# Altium PCB LED_Control.PcbDoc (part 1 of 2)
Units mil, origin at the board's own origin, x right, y up, seen from the top; angles counter-clockwise.
Board outline 2900 x 5000 mil, 4 copper layers (Top Layer, GND1, GND2, Bottom Layer), stack 51.864 mil thick; 104 components, 87 nets, 410 pads, 194 vias.
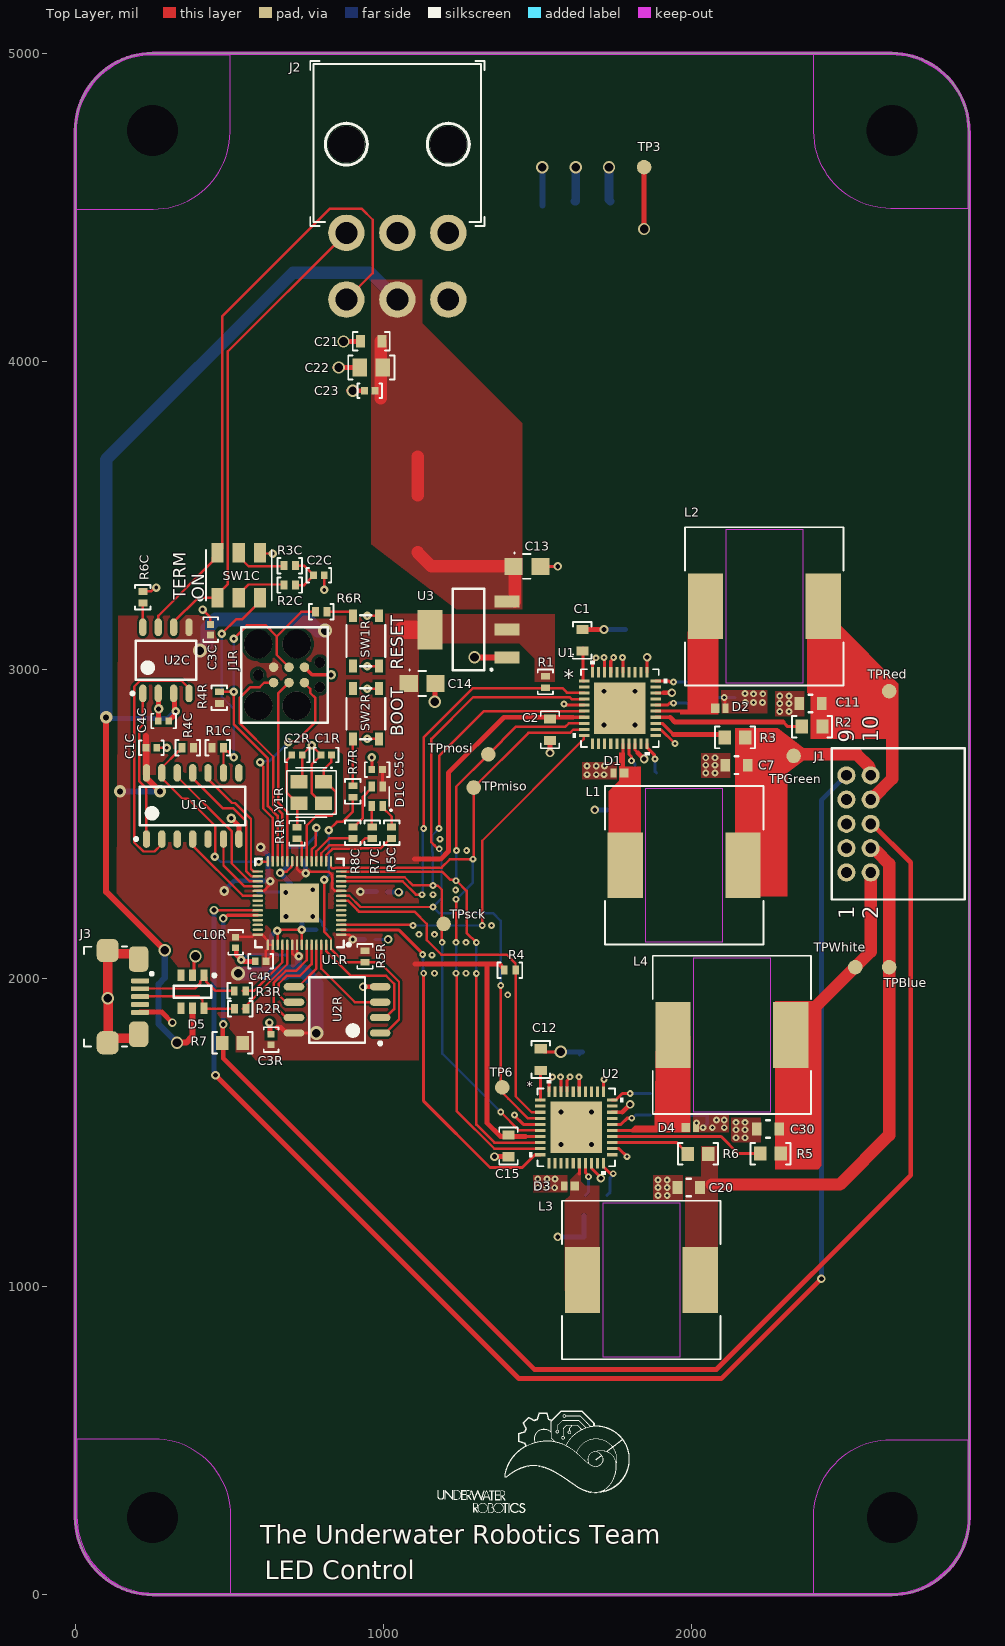
[diagram p0: Top Layer view]
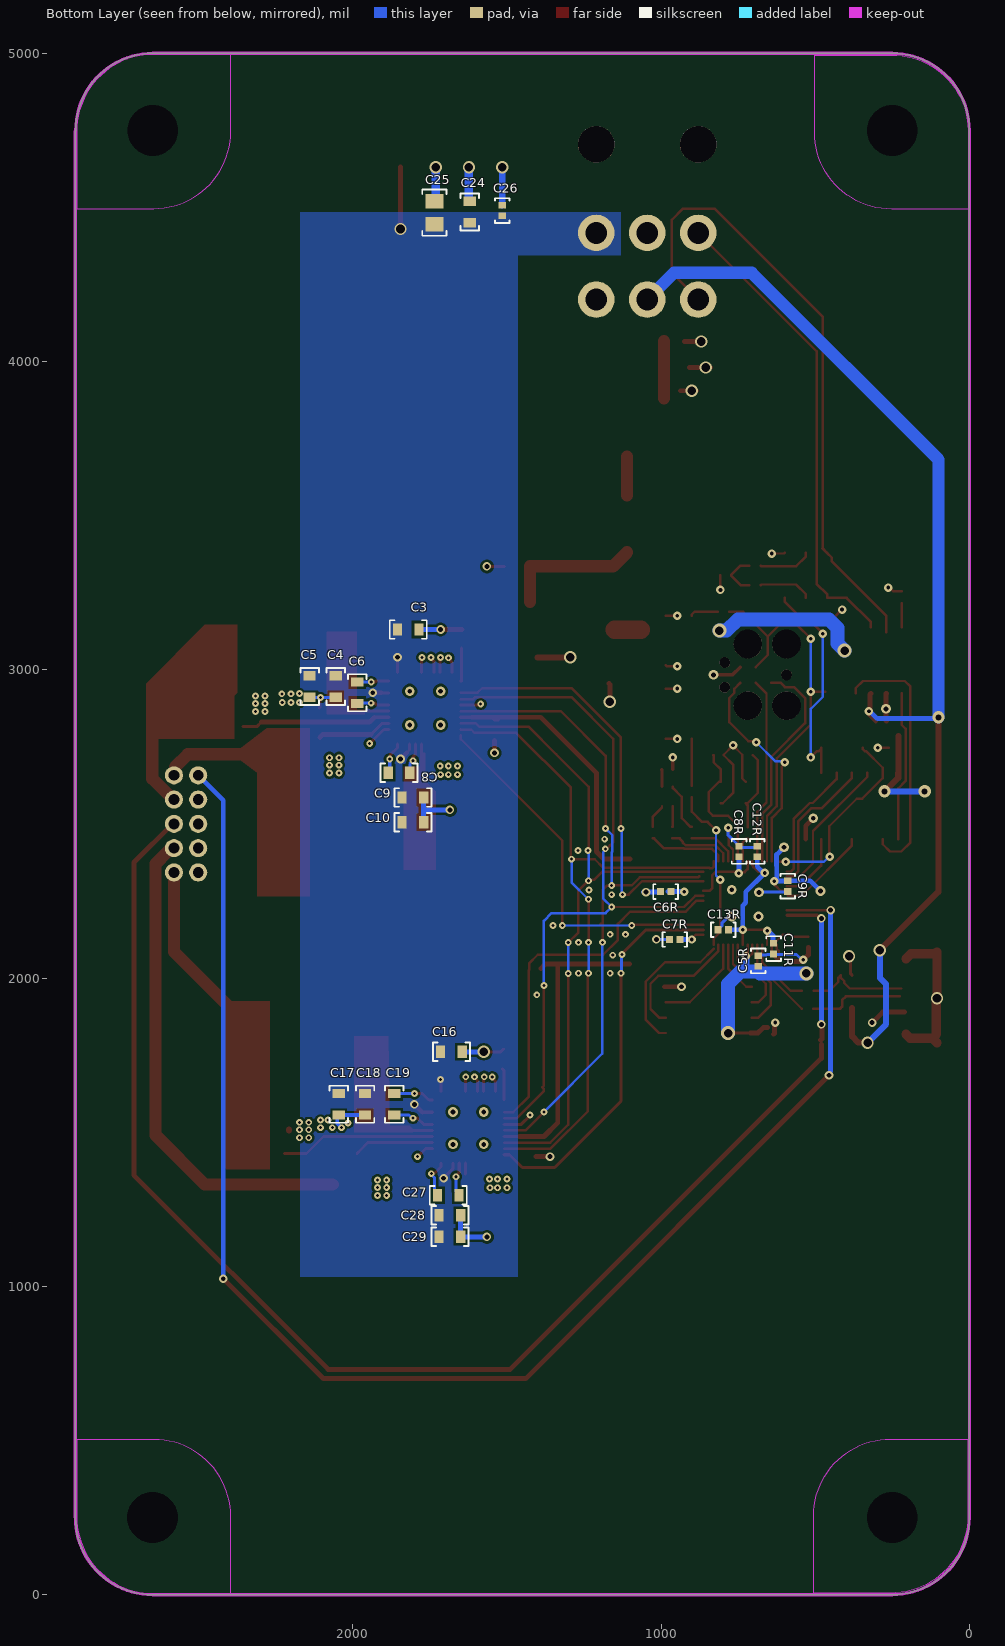
[diagram p1: Bottom Layer view, seen from below]
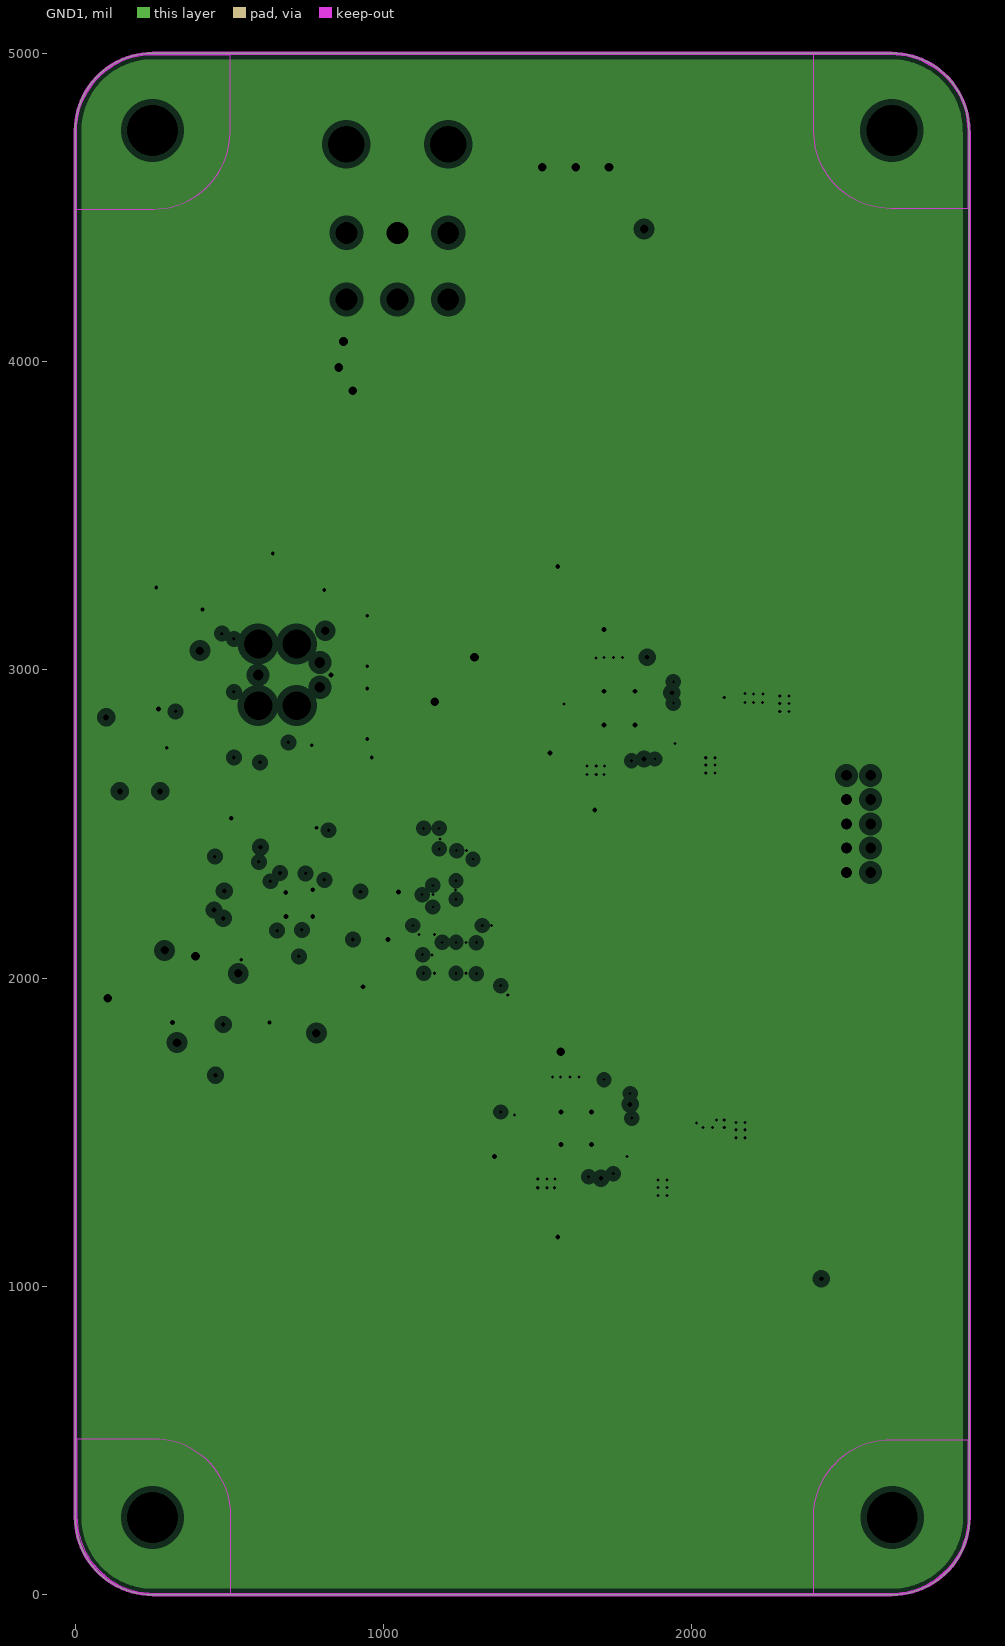
[diagram p2: GND1, clearances drawn from the general rule]
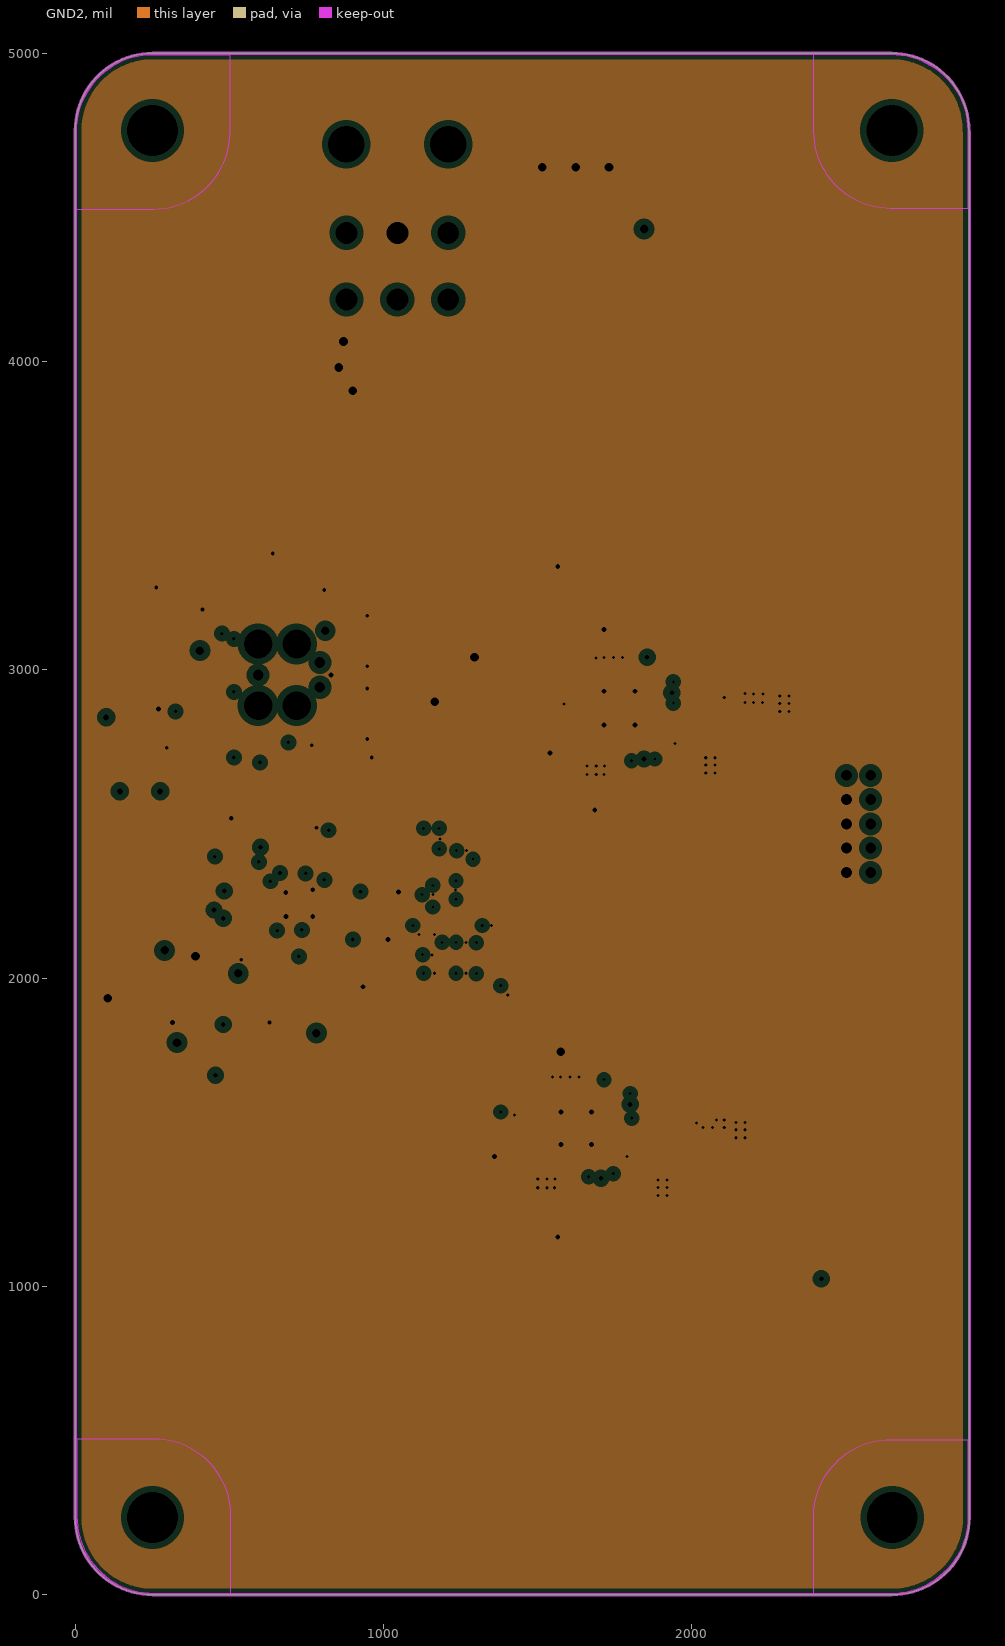
[diagram p3: GND2, clearances drawn from the general rule]
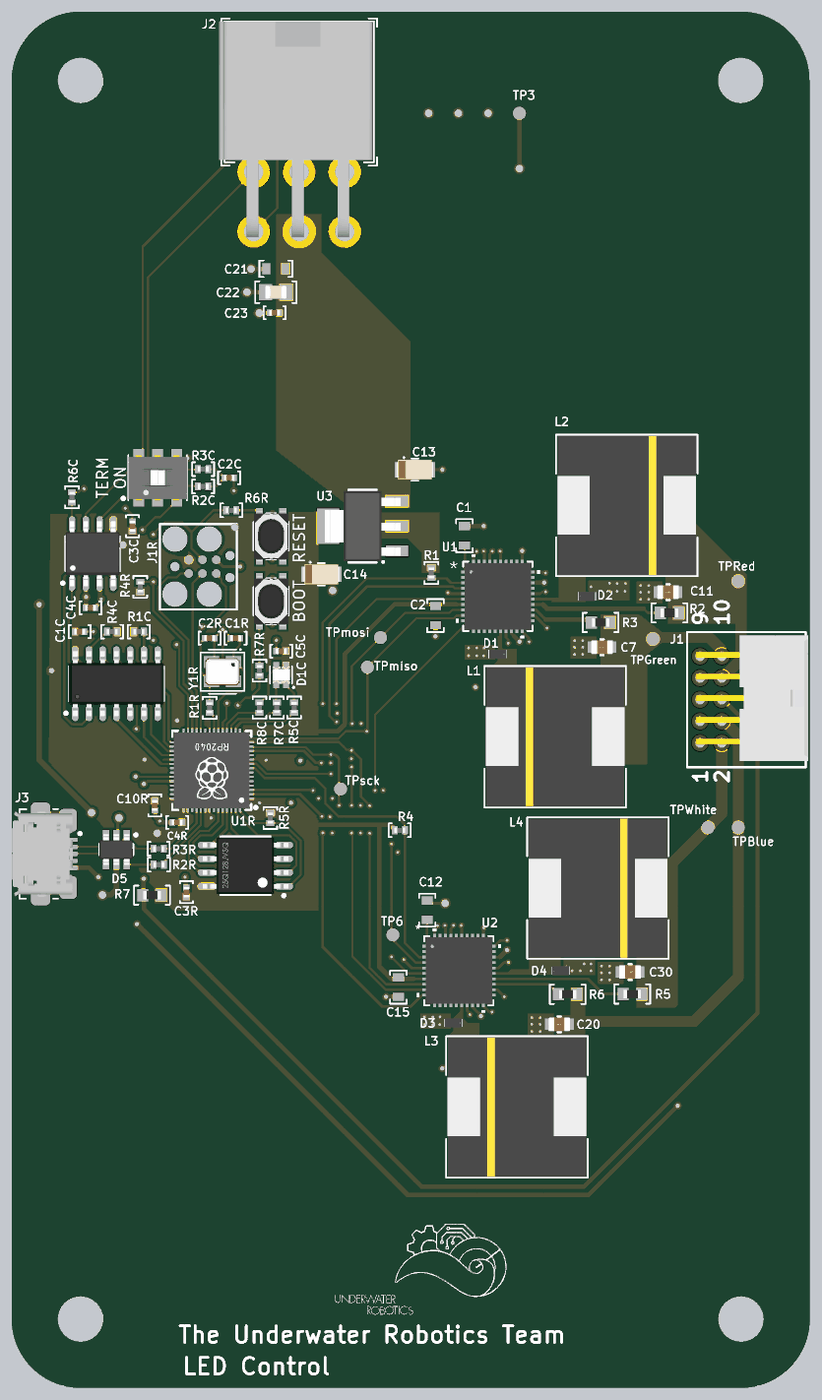
[diagram p5: 3D render of the assembled board from above, using the file's embedded part models]
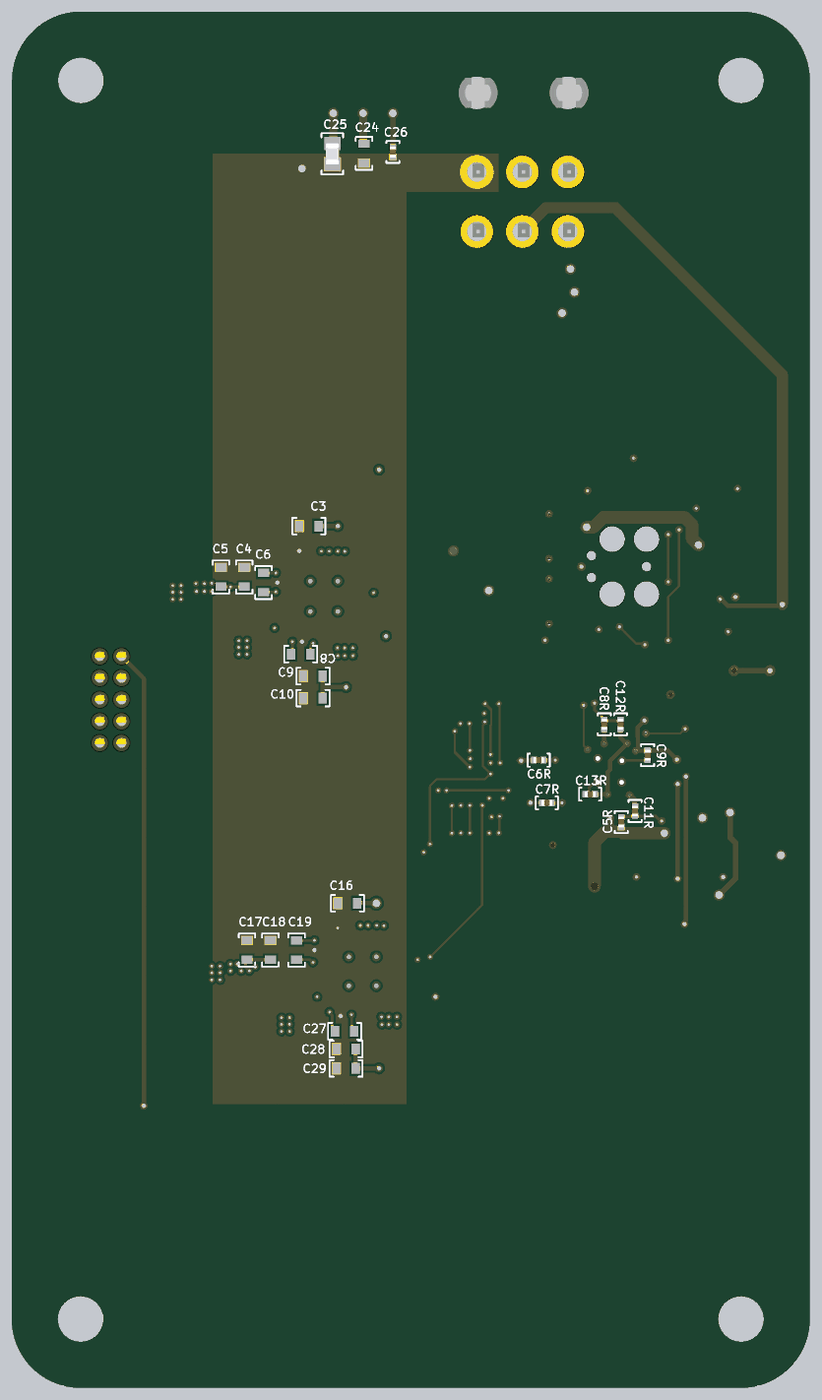
[diagram p6: 3D render of the assembled board from below, using the file's embedded part models]

## Layer stack, top to bottom
Top Solder: solder mask 1, SM-001, Dk 4
Top Layer: signal copper 1.378
Dielectric 1: prepreg 5.1, PP-017, Dk 4.3
Dielectric 2: prepreg 5.1, PP-017, Dk 4.3
GND1: plane copper 0.3539, net GND
Dielectric 3: core 28, Core-039, Dk 4.8
GND2: plane copper 0.3539, net GND
Dielectric 4: prepreg 5.1, PP-017, Dk 4.3
Dielectric 5: prepreg 5.1, PP-017, Dk 4.3
Bottom Layer: signal copper 1.378
Bottom Solder: solder mask 1, SM-001, Dk 4

## Board outline
0,250 0,4750 cw(c250,4750) 250,5000 2648.66,5000 cw(c2648.66,4750) 2898.66,4750 2900,4748.03 2900,250 2899.88,250 cw(c2649.88,250) 2649.88,0 250,0 cw(c250,250)

## Design rules (kind name [scope] priority, off if disabled: settings)
AcuteAngle [All] p1: minimum=6.00000000000000E+0001 checktracksonly=FALSE
BoardOutlineClearance "BoardOutlineClearance JLCPCB" [All] p1: gap=7.87 ignorepadtopadclearanceinfootprint=FALSE
Clearance "Clearance JLCPCB 4 layer" [All] p1: gap=7.87 ignorepadtopadclearanceinfootprint=FALSE except(3.54: Arc-Arc Arc-Track Track-Track; 5: Arc-SMDPad Track-SMDPad SMDPad-SMDPad; 10: Arc-Hole Track-Hole SMDPad-Hole THPad-Hole Via-Hole Fill-Hole Poly-Hole Region-Hole Text-Hole)
DiffPairsRouting [All] p1: maxlimit=10 minlimit=6 mostfreqgap=8 toplayer_minwidth=3.54 toplayer_maxwidth=15 toplayer_prefwidth=8 bottomlayer_minwidth=3.54 bottomlayer_maxwidth=15 bottomlayer_prefwidth=8 maxuncoupledlength=500
HoleSize "HoleSize JLCPCB Pad" [IsPad] p1: absolutevalues=TRUE maxlimit=248.03 minlimit=19.68 maxpercent=80.000 minpercent=20.000
HoleSize "HoleSize JLCPCB 4 layer" [All] p2: absolutevalues=TRUE maxlimit=248.03 minlimit=7.87 maxpercent=80.000 minpercent=20.000
HoleToHoleClearance "HoleToHoleClearance JLCPCB" [All] p1: gap=10 allowstackedmicrovias=TRUE
MinimumAnnularRing "MinimumAnnularRing JLCPCB Pad" [IsPad] p1: minimumring=11.81
MinimumAnnularRing "MinimumAnnularRing JLCPCB 1oz" [All] p2: minimumring=5.12
MinimumSolderMaskSliver [All] p1: minsoldermaskwidth=1
PlaneClearance [All] p1: clearance=20
PlaneConnect [All] p1: pad.planeconnectstyle=Relief pad.reliefexpansion=20 pad.reliefentries=4 pad.reliefconductorwidth=10 pad.reliefairgap=10 via.planeconnectstyle=Direct via.reliefexpansion=20 via.reliefentries=4 via.reliefconductorwidth=10 via.reliefairgap=10
PolygonConnect [All] p1: connectstyle=Direct reliefconductorwidth=15 reliefentries=4 polygonreliefangle="45 Angle" airgapwidth=10
RoutingVias "RoutingVias JLCPCB 4 layer" [All] p1: holewidth=19.68 width=39.37 viastyle="Through Hole" minholewidth=7.87 minwidth=15.75 maxholewidth=50 maxwidth=80
SilkToSilkClearance [All] p1: silktosilkclearance=3
SilkToSolderMaskClearance "SilkToSolderMaskClearance JLCPCB" [IsPad] p1: minsilkscreentomaskgap=5.91 clearancetoexposedcopper=TRUE
SolderMaskExpansion "SolderMaskExpansion JLCPCB" [All] p1: expansion=1.97 istentingtop=FALSE
Width "Width JLCPCB 4 layer" [All] p1: maxlimit=196.85 minlimit=3.54 preferedwidth=9.84 minimp=50.000000 maximp=50.000000 favimp=50.000000
22 further rules are at their usual default settings.

## Classes and differential pairs
differential pair class "USB 2.0": USB USB_RP2040
component class U_RP2040_with_CAN: C1C C2C C3C C4C C5C D1C R1C R2C R3C R4C R5C R6C R7C R8C SW1C U1C U2C
component class U_RP2040_C: C1R C2R C3R C4R C5R C6R C7R C8R C9R C10R C11R C12R C13R J1R R1R R2R R3R R4R R5R R6R R7R SW1R SW2R U1R U2R Y1R
component class LED_Board_control: C1 C2 C3 C4 C5 C6 C7 C8 C9 C10 C11 C12 C13 C14 C15 C16 C17 C18 C19 C20 C21 C22 C23 C24 C25 C26 C27 C28 C29 C30 D1 D2 D3 D4 D5 J1 J2 J3 L1 L2 L3 L4 R1 R2 R3 R4 R5 R6 R7 TP3 TP6 TPBlue TPGreen TPmiso TPmosi TPRed TPsck TPWhite U1 U2 U3
differential pair USB: +USB_P -USB_N
differential pair USB_RP2040: +USB_RP2040_P -USB_RP2040_N

## Components (designator, comment, footprint, x,y, rotation, side; value= is the part's Value field where it differs from the comment)
C1 "4.7uF Ceramic 6.3V" CAPACITOR_0603 1645,3095.8 r90 top value=4.7uF
C1C "100nF Ceramic 25V" CAPACITOR_0402 246.81,2747.4 r0 top value=0.1uF
C1R "27pF Ceramic 50V" CAPACITOR_0402 813.74,2723.78 r180 top value=27pF
C2 "100nF Ceramic 6.3V" CAPACITOR_0603 1540,2805.8 r270 top value=0.1uF
C2C "4700pF Ceramic 25V" CAPACITOR_0402 790.12,3306.46 r180 top value=4.7nF
C2R "27pF Ceramic 50V" CAPACITOR_0402 719.25,2723.78 r0 top value=27pF
C3 "4.7uF" CAPACITOR_0603 1820,3130.8 r180 bottom
C3C "100nF Ceramic 25V" CAPACITOR_0402 438.94,3130.43 r90 top value=0.1uF
C3R "100nF Ceramic 6.3V" CAPACITOR_0402 635,1800.8 r90 top value=0.1uF
C4 "1uF Ceramic 25V" CAPACITOR_0603 2055,2945.8 r90 bottom value=1uF
C4C "100nF Ceramic 25V" CAPACITOR_0402 286.18,2834.01 r180 top value=0.1uF
C4R "1uF Ceramic 16V" CAPACITOR_0402 601.14,2054.49 r180 top value=1uF
C5 "100nF Ceramic 25V" CAPACITOR_0603 2140,2945.8 r270 bottom value=0.1uF
C5C "1uF Ceramic 16V" CAPACITOR_0402 979.09,2676.53 r180 top value=1uF
C5R "100nF Ceramic 6.3V" CAPACITOR_0402 685,2055.8 r90 bottom value=0.1uF
C6 "100nF Ceramic 25V" CAPACITOR_0603 1985,2925.8 r270 bottom value=0.1uF
C6R "100nF Ceramic 6.3V" CAPACITOR_0402 985,2280.8 r0 bottom value=0.1uF
C7 "22uF" FP-C2012-125-0_2-MFG 2145,2690.8 r180 top
C7R "100nF Ceramic 6.3V" CAPACITOR_0402 955.47,2125.35 r0 bottom value=0.1uF
C8 "100nF Ceramic 25V" CAPACITOR_0603 1850,2665.8 r0 bottom value=0.1uF
C8R "100nF Ceramic 6.3V" CAPACITOR_0402 746.92,2410.94 r90 bottom value=0.1uF
C9 "1uF Ceramic 25V" CAPACITOR_0603 1805,2585.8 r0 bottom value=1uF
C9R "100nF Ceramic 6.3V" CAPACITOR_0402 589.33,2298.58 r270 bottom value=0.1uF
C10 "100nF Ceramic 25V" CAPACITOR_0603 1805,2505.8 r180 bottom value=0.1uF
C10R "100nF Ceramic 6.3V" CAPACITOR_0402 520,2115.8 r270 top value=0.1uF
C11 "22uF" FP-C2012-125-0_2-MFG 2385,2890.8 r180 top
C11R "1uF Ceramic 16V" CAPACITOR_0402 635,2095.8 r270 bottom value=1uF
C12 "4.7uF Ceramic 6.3V" CAPACITOR_0603 1510,1735.8 r90 top value=4.7uF
C12R "100nF Ceramic 6.3V" CAPACITOR_0402 687.76,2410.94 r90 bottom value=0.1uF
C13 "10uF Tantalum 16V" "CAPACITOR_1206 - POLAR" 1465,3335.8 r0 top
C13R "100nF Ceramic 6.3V" CAPACITOR_0402 797.99,2156.85 r0 bottom value=0.1uF
C14 "10uF Tantalum 16V" "CAPACITOR_1206 - POLAR" 1125,2955.8 r0 top
C15 "100nF Ceramic 6.3V" CAPACITOR_0603 1405,1455.8 r270 top value=0.1uF
C16 "4.7uF" CAPACITOR_0603 1680,1760.8 r180 bottom
C17 "1uF Ceramic 25V" CAPACITOR_0603 2045,1590.8 r90 bottom value=1uF
C18 "100nF Ceramic 25V" CAPACITOR_0603 1960,1590.8 r270 bottom value=0.1uF
C19 "100nF Ceramic 25V" CAPACITOR_0603 1865,1590.8 r270 bottom value=0.1uF
C20 "22uF" FP-C2012-125-0_2-MFG 1990,1320.8 r180 top
C21 "1uF Ceramic 16V" CAPACITOR_0603 960,4065.8 r180 top value=1uF
C22 "100nF Ceramic 50V" CAPACITOR_0805 960,3980.8 r180 top value=0.1uF
C23 "22nF Ceramic 25V" CAPACITOR_0402 955,3905.8 r180 top value=22nF
C24 "1uF Ceramic 16V" CAPACITOR_0603 1620,4485 r90 bottom value=1uF
C25 "100nF Ceramic 50V" CAPACITOR_0805 1735,4483.2 r90 bottom value=0.1uF
C26 "22nF Ceramic 25V" CAPACITOR_0402 1515,4490 r90 bottom value=22nF
C27 "100nF Ceramic 25V" CAPACITOR_0603 1690,1295.8 r0 bottom value=0.1uF
C28 "1uF Ceramic 25V" CAPACITOR_0603 1685,1230.8 r0 bottom value=1uF
C29 "100nF Ceramic 25V" CAPACITOR_0603 1685,1160.8 r180 bottom value=0.1uF
C30 "22uF" FP-C2012-125-0_2-MFG 2247.04,1510.8 r180 top
D1 "CCS15S40,L3F" "SOD-963   CST2C_TOS" 1765,2665.8 r180 top
D1C "EAST1616RGBB4" LED_0606_4SMD 979.09,2589.92 r90 top
D2 "CCS15S40,L3F" "SOD-963   CST2C_TOS" 2090,2875.8 r0 top
D3 "CCS15S40,L3F" "SOD-963   CST2C_TOS" 1605,1325.8 r180 top
D4 "CCS15S40,L3F" "SOD-963   CST2C_TOS" 1995,1515.8 r0 top
D5 "TVS DIODE 5VWM 25VC SOT23-6" "SOT 23-6L" 380,1955.8 r270 top
J1 "10pos 3.8A conn" SAMTEC-LS2-105-01-X-D-RA1 2414.92,2215.8 r90 top
J1R "TagConnect SWD" TC2030-MCP 593.27,2983.62 r0 top
J2 "Mini-Fit Jr R/A" "CONN_MOLEX_MINIFIT JR_6 POS_R/A" 1210,4705 r180 top
J3 "USB_MICRO R/A" CONN_MINIUSB 105,1940 r270 top
L1 "SRR1280-221K" IND_BOURNS_SRR1280 1975,2365.8 r0 top
L2 "SRR1280-221K" IND_BOURNS_SRR1280 2235,3205.8 r180 top
L3 "SRR1280-221K" IND_BOURNS_SRR1280 1836,1020.8 r0 top
L4 "SRR1280-221K" IND_BOURNS_SRR1280 2130,1815.8 r180 top
R1 "10k Ohm 1% 1/16W" RESISTOR_0402 1525,2960.8 r270 top
R1C "10k Ohm 1% 1/16W" RESISTOR_0402 461.97,2747.4 r0 top
R1R "1k Ohm 1% 1/16W" RESISTOR_0402 719.25,2470.75 r90 top
R2 "27 Ohm 5% 1/8W" RESISTOR_0603 2390,2815.8 r180 top
R2C "60.4 Ohm 1% 1/16W" RESISTOR_0402 695.63,3274.96 r0 top
R2R "27 Ohm 1% 1/16W" RESISTOR_0402 535,1900.8 r0 top
R3 "27 Ohm 5% 1/8W" RESISTOR_0603 2140,2780.8 r180 top
R3C "60.4 Ohm 1% 1/16W" RESISTOR_0402 695.63,3337.95 r0 top
R3R "27 Ohm 1% 1/16W" RESISTOR_0402 534.15,1958.8 r0 top
R4 "10k Ohm 1% 1/16W" RESISTOR_0402 1410,2025.8 r0 top
R4C "10k Ohm 1% 1/16W" RESISTOR_0402 364.92,2747.4 r180 top
R4R "10k Ohm 1% 1/16W" RESISTOR_0402 467.28,2909.8 r90 top
R5 "27 Ohm 5% 1/8W" RESISTOR_0603 2255,1430.8 r180 top
R5C "604 Ohm 1% 1/16W" RESISTOR_0402 1026.34,2471.81 r90 top
R5R "10k Ohm 1% 1/16W" RESISTOR_0402 939.72,2070.23 r270 top
R6 "27 Ohm 5% 1/8W" RESISTOR_0603 2020,1430 r180 top
R6C "10k Ohm 1% 1/16W" RESISTOR_0402 219.06,3235.59 r90 top
R6R "1k Ohm 1% 1/16W" RESISTOR_0402 797.99,3188.35 r180 top
R7 "10k Ohm 0.5% 1/10W" RESISTOR_0603 510,1790 r180 top
R7C "200 Ohm 1% 1/16W" RESISTOR_0402 963.35,2471.81 r90 top
R7R "1k Ohm 1% 1/16W" RESISTOR_0402 900.35,2605.67 r270 top
R8C "200 Ohm 1% 1/16W" RESISTOR_0402 900.35,2471.81 r90 top
SW1C "Switch DPDT" CAS-220TA 530.28,3306.46 r0 top
SW1R "434123025826" SMD_434123025826 942.68,3093.86 r90 top
SW2R "434123025826" SMD_434123025826 942.68,2857.64 r90 top
TP3 "PCB Test Point" TESTPOINT_1.2MM 1845,4630.8 r90 top
TP6 "PCB Test Point" TESTPOINT_1.2MM 1385,1645.8 r0 top
TPBlue "PCB Test Point" TESTPOINT_1.2MM 2640,2035.8 r90 top
TPGreen "PCB Test Point" TESTPOINT_1.2MM 2330,2720.8 r90 top
TPmiso "PCB Test Point" TESTPOINT_1.2MM 1292.5,2618.3 r0 top
TPmosi "PCB Test Point" TESTPOINT_1.2MM 1340,2725.8 r0 top
TPRed "PCB Test Point" TESTPOINT_1.2MM 2640,2930.8 r90 top
TPsck "PCB Test Point" TESTPOINT_1.2MM 1195,2175.8 r0 top
TPWhite "PCB Test Point" TESTPOINT_1.2MM 2530,2035.8 r90 top
U1 "L99LD20Q6TR" L99LD20Q6TR 1766.5,2875.8 r0 top
U1C "MCP2517FD" SOIC-14 380.67,2558.42 r90 top
U1R "RP2040" "QFN-56 RP2040" 727.13,2243.46 r180 top locked
U2 "L99LD20Q6TR" L99LD20Q6TR 1625,1515.8 r0 top
U2C "CAN Transceiver" SOIC-8 294.06,3030.86 r90 top
U2R "W25Q128JVSIQ" "SOIC-8 W25QxJV" 849.23,1897.01 r180 top
U3 "LM1117IMPX-3.3/NOPB" SOT-223-4 1275,3130.8 r180 top
Y1R "CRYSTAL 12.0000MHZ 18PF SMD" "4-SMD, NO LEAD CRYSTAL 3.2x2.5mm" 805.87,2637.16 r180 top

## Footprints (in the part's own frame and the unit in brackets; to place one, negate y for a bottom-side part, rotate by r counter-clockwise, add the part's x,y. Pads: shape width x height; smd on the part's side, far side on the other; paste and mask are expansions set on the pad)
"4-SMD, NO LEAD CRYSTAL 3.2x2.5mm" [mm]
  rrect0% 1.4x1.1 smd: 1(0,0) 2(2.032,0) 3(2.032,1.778) 4(0,1.778)
  silkscreen extent -1.02,-1.2 3.05,2.92, body extent -0.58,-0.36 2.62,2.14, height 0.82
CAPACITOR_0402 [mm]
  rect 0.56x0.6 smd: 1(-0.435,0) 2(0.435,0)
  silkscreen extent -1.02,-0.6 1.02,0.6, body extent -0.5,-0.28 0.5,0.27, height 0.51
CAPACITOR_0603 [mil] "CAPACITOR 0603"
  rect 30x40 smd: 1(-35,0) 2(35,0)
  silkscreen extent -60,-30 60,30, body extent -31,-16 32,16, height 31
CAPACITOR_0805 [mm] "CAPACITOR 0805"
  rect 1.2x1.5 smd: 1(-0.95,0) 2(0.95,0)
  silkscreen extent -1.91,-1 1.9,1, body extent -1,-0.62 1,0.63, height 1.26
"CAPACITOR_1206 - POLAR" [mil]
  rect 58.96x55 smd paste+0 mask+0: 1(-43.52,0) 2(43.52,0)
  silkscreen extent -44,-40 12,48, body extent -67,-36 67,36, height 73
CAS-220TA [mm] "SWITCH SLIDE DPDT 100MA 6V"
  rrect0% 1x1.6 smd: 1(-1.75,-1.85) 2(0,-1.85) 3(1.75,-1.85) 4(-1.75,1.85) 5(0,1.85) 6(1.75,1.85)
  silkscreen extent -3.3,-2.1 2.7,2.1, body extent -2.7,-2.1 2.7,2.1, height 2.51
CONN_MINIUSB [mm] "USB2.0 Micro-B Receptacle SMD R/A"
  rrect50% 0.4x1.5 smd: 1(-1.3,2.675) 2(-0.65,2.675) 3(0,2.675) 4(0.65,2.675) 5(1.3,2.675)
  rrect50% 2.1x1.6 smd: 6(-3.1,2.55) 7(3.1,2.55)
  rrect50% 1.9x1.8 smd: 8(3.8,0) 9(-3.8,0)
  silkscreen extent -4.14,-1.96 4.11,3.75, body extent -3.96,-2.67 3.96,2.99, height 2.72
"CONN_MOLEX_MINIFIT JR_6 POS_R/A" [mm] "Molex Minifit Jr 5569 6 Pos R/A"
  round 3 hole 1.801: 1(8.4,7.3) 4(8.4,12.8)
  round 3 hole 1.8: 2(4.2,7.3) 3(0,7.3) 5(4.2,12.8) 6(0,12.8)
  round 3 hole 3 unplated mask+0: ""(0,0) ""(8.4,0)
  silkscreen extent -2.98,-6.86 11.38,6.73, body extent -2.58,-6.6 11.62,13.33, height 11.4
FP-C2012-125-0_2-MFG [mm]
  rect 0.8x1.05 smd paste+0 mask+0: 1(-0.925,0) 2(0.925,0)
  silkscreen extent -0.15,-0.72 0.15,0.72, body extent -1.43,-0.82 1.43,0.82, height 0.25
IND_BOURNS_SRR1280 [mil] "220 µH Shielded Drum Core, Wirewound Inductor 1.6 A 400mOhm Max Nonstandard"
  rect 114x213 smd paste+0 mask+0: 1(-191,0) 2(191,0)
  Top Layer keep-out region: -124.13,-250 -124.13,250 124.13,250 124.13,-250
  silkscreen extent -257,-257 257,257, body extent -252,-252 252,252, height 315
L99LD20Q6TR [mil] "IC LED DRVR RGLTR PWM 1.5A 40QFN"
  rect 34x10 smd paste+0 mask+0: 1(-116,88.61) 2(-116,68.92) 3(-116,49.23) 4(-116,29.54) 5(-116,9.85) 6(-116,-9.84) 7(-116,-29.53) 8(-116,-49.22) 9(-116,-68.91) 10(-116,-88.6) 21(116,-88.6) 22(116,-68.91) 23(116,-49.22) 24(116,-29.53) 25(116,-9.84) 26(116,9.85) 27(116,29.54) 28(116,49.23) 29(116,68.92) 30(116,88.61)
  rect 10x34 smd paste+0 mask+0: 11(-88.61,-116) 12(-68.91,-116) 13(-49.22,-116) 14(-29.54,-116) 15(-9.85,-116) 16(9.85,-116) 17(29.54,-116) 18(49.22,-116) 19(68.91,-116) 20(88.61,-116) 31(88.61,116) 32(68.91,116) 33(49.22,116) 34(29.54,116) 35(9.85,116) 36(-9.85,116) 37(-29.54,116) 38(-49.22,116) 39(-68.91,116) 40(-88.61,116)
  rect 167x167 smd paste-83 mask+0: 41(0,0)
  silkscreen extent -153,-153 153,153, body extent -121,-121 121,121, height 41
LED_0606_4SMD [mm]
  rrect0% 0.8x0.55 smd: 1(-0.8,-0.45) 2(-0.8,0.45) 3(0.8,0.45) 4(0.8,-0.45)
  silkscreen extent -1.22,-1.22 0.8,1.02, body extent -0.8,-0.8 0.8,0.8, height 0.35
"QFN-56 RP2040" [mm] "QFN, 56-Leads, Body 7.00x7.00mm, Pitch 0.40mm, Thermal Pad 3.10x3.10mm, IPC Medium Density"
  oval 0.875x0.2 smd: 1(-3.437,2.6) 2(-3.437,2.2) 3(-3.437,1.8) 4(-3.437,1.4) 5(-3.437,1) 6(-3.437,0.6) 7(-3.437,0.2) 8(-3.437,-0.2) 9(-3.437,-0.6) 10(-3.437,-1) 11(-3.437,-1.4) 12(-3.437,-1.8) 13(-3.437,-2.2) 14(-3.437,-2.6) 29(3.437,-2.6) 30(3.437,-2.2) 31(3.437,-1.8) 32(3.437,-1.4) 33(3.437,-1) 34(3.437,-0.6) 35(3.437,-0.2) 36(3.437,0.2) 37(3.437,0.6) 38(3.437,1) 39(3.437,1.4) 40(3.437,1.8) 41(3.437,2.2) 42(3.437,2.6)
  oval 0.2x0.875 smd: 15(-2.6,-3.437) 16(-2.2,-3.437) 17(-1.8,-3.437) 18(-1.4,-3.437) 19(-1,-3.437) 20(-0.6,-3.437) 21(-0.2,-3.437) 22(0.2,-3.437) 23(0.6,-3.437) 24(1,-3.437) 25(1.4,-3.437) 26(1.8,-3.437) 27(2.2,-3.437) 28(2.6,-3.437) 43(2.6,3.437) 44(2.2,3.437) 45(1.8,3.437) 46(1.4,3.437) 47(1,3.437) 48(0.6,3.437) 49(0.2,3.437) 50(-0.2,3.437) 51(-0.6,3.437) 52(-1,3.437) 53(-1.4,3.437) 54(-1.8,3.437) 55(-2.2,3.437) 56(-2.6,3.437)
  rect 3.2x3.2 smd: 57(0,0)
  silkscreen extent -4.19,-3.65 3.65,3.65, body extent -3.52,-3.52 3.52,3.52, height 0.85
RESISTOR_0402 [mm] "Resistor 0402"
  rect 0.55x0.75 smd: 1(-0.475,0) 2(0.475,0)
  silkscreen extent -1.02,-0.64 1.02,0.64, body extent -0.5,-0.25 0.5,0.25, height 0.25
RESISTOR_0603 [mil] "Resistor 0603"
  rect 40x45 smd: 1(-33.5,0) 2(33.5,0)
  silkscreen extent -65,-35 65,35, body extent -31,-16 32,16, height 16
SAMTEC-LS2-105-01-X-D-RA1 [mm]
  round 1.49 hole 0.89 mask+0: 1(3.229,-2.193) 2(3.229,-4.193) 3(5.229,-2.193) 4(5.229,-4.193) 5(7.229,-2.193) 6(7.229,-4.193) 7(9.229,-2.193) 8(9.229,-4.193) 9(11.229,-2.193) 10(11.229,-4.193)
  silkscreen extent 1,-11.94 13.46,-1, body extent 1.58,-12.19 13.15,-1.81, height 5.34
SMD_434123025826 [mm]
  rect 1.05x0.65 smd: A1(-2.075,1.075) A2(2.075,1.075) B1(-2.075,-1.075) B2(2.075,-1.075)
  silkscreen extent -2.1,-1.6 2.1,1.6, body extent -2.3,-1.6 2.3,1.6, height 2.5
"SOD-963   CST2C_TOS" [mil]
  rect 28x30 smd paste-14 mask+0: 1(-14.7,0)
  rect 20x30 smd paste-10 mask+0: 2(18.7,0)
  body extent -33,-16 33,16, height 20
SOIC-8 [mm] "SOIC, 8-Leads, Body 4.90x3.90mm, Pitch 1.27mm, IPC Medium Density"
  oval 1.45x0.6 smd: 1(-2.725,1.905) 2(-2.725,0.635) 3(-2.725,-0.635) 4(-2.725,-1.905) 5(2.725,-1.905) 6(2.725,-0.635) 7(2.725,0.635) 8(2.725,1.905)
  silkscreen extent -2.85,-2.5 1.6,2.88, body extent -3,-2.5 3,2.5, height 1.75
"SOIC-8 W25QxJV" [mm] "SOIC, 8-Leads, Body 5.28x5.28mm, Pitch 1.27mm, IPC Medium Density"
  oval 1.7x0.6 smd: 1(-3.55,1.905) 2(-3.55,0.635) 3(-3.55,-0.635) 4(-3.55,-1.905) 5(3.55,-1.905) 6(3.55,-0.635) 7(3.55,0.635) 8(3.55,1.905)
  silkscreen extent -3.68,-2.7 2.3,2.88, body extent -3.95,-2.62 3.95,2.62, height 1.95
SOIC-14 [mm] "SOIC, 14-Leads, Body 8.65x3.90mm, Pitch 1.27mm, IPC Medium Density"
  oval 1.45x0.6 smd: 1(-2.725,3.81) 2(-2.725,2.54) 3(-2.725,1.27) 4(-2.725,0) 5(-2.725,-1.27) 6(-2.725,-2.54) 7(-2.725,-3.81) 8(2.725,-3.81) 9(2.725,-2.54) 10(2.725,-1.27) 11(2.725,0) 12(2.725,1.27) 13(2.725,2.54) 14(2.725,3.81)
  silkscreen extent -2.85,-4.35 1.6,4.78, body extent -3,-4.4 3,4.4, height 1.7
"SOT 23-6L" [mm] "SOT23, 6-Leads, Body 2.95x2.80mm, Pitch 0.95mm, IPC Medium Density"
  rect 0.95x0.6 smd: 1(-1.35,0.95) 2(-1.35,0) 3(-1.35,-0.95) 4(1.35,-0.95) 5(1.35,0) 6(1.35,0.95)
  silkscreen extent -1.47,-1.55 0.5,1.93, body extent -1.4,-1.55 1.4,1.55, height 1.45
SOT-223-4 [mm]
  rect 2.05x1 smd paste+0 mask+0.102: 1(-3.175,2.3) 2(-3.175,0) 3(-3.175,-2.3)
  rect 2.05x3.25 smd paste+0 mask+0.102: 4(3.175,0)
  silkscreen extent -1.96,-3.35 1.3,3.35, body extent -3.5,-3.25 3.5,3.25, height 1.68
TC2030-MCP [mil]
  round 31 smd: 1(50,-25) 2(50,25) 3(100,-25) 4(100,25) 5(150,-25) 6(150,25)
  round 34 hole 35 unplated: A(0,0) B(200,40) C(200,-40)
  round 92 hole 93 unplated: D(0,-100) E(125,-100) F(0,100) G(125,100)
  silkscreen extent -55,-155 225,155
TESTPOINT_1.2MM [mm]
  round 1.2 smd: TP(0,0)

## Part data
C1 C12: library part CAPACITOR_4.7uF_0603, "Cap 4.7uF 6.3V +/-10% / Ceramic 0603", Supplier Part Number 1=1276-2087-1-ND, Tolerance="+/- 10%", Voltage=6.3V, Made By="Robert Pafford", Supplier 1=Digi-Key
C1C C3C C3R C4C C5R C6R C7R C8R C9R C10R C12R C13R: library part CAPACITOR_0.1uF_0402, "Cap 100nF 25V +/-10% / Ceramic 0402", Supplier Part Number 1=478-7868-1-ND, Tolerance="+/- 10%", Voltage=25V, Made By="Robert Pafford", Supplier 1=Digi-Key
C1R C2R: library part CAPACITOR_0.000027uF_0402, "Cap 27pF 50V +/-5% / Ceramic 0402", Supplier Part Number 1=445-5589-1-ND, Tolerance="+/- 5%", Voltage=50V, Made By="Robert Pafford", Supplier 1=Digi-Key
C2 C15: library part CAPACITOR_0.1uF_0603_1, "Cap 100nF 6.3V +/-10% / Ceramic 0603", Supplier Part Number 1=399-15351-1-ND, Tolerance="+/- 10%", Voltage=6.3V, ComponentLink1Description=Datsheet, ComponentLink1URL=https://www.mouser.com/datasheet/2/212/KEM_C1002_X7R_SMD-1102033.pdf, Made By="Flip B", Supplier 1=Digi-Key
C2C: library part CAPACITOR_0.0047uF_0402, "4700 pF +/-10% 25V Ceramic Capacitor X7R 0402", Supplier Part Number 1=478-6195-1-ND, Tolerance="+/- 10%", Voltage=25V, Made By="Robert Pafford", Supplier 1=Digi-Key
C3 C16: library part "CAP CERM 4.7UF 20% 35V", "Chip Multilayer Ceramic Capacitors for General Purpose, 0603, 4.7uF, X5R, 15%, 20%, 35V", Case Code (Imperial)=0603, Case Code (Metric)=1608, Dielectric=X5R, Max Operating Temperature=85°C, Min Operating Temperature=-55°C, Package Quantity=4000, Resistor Type=Ceramic, Supplier Part Number 1=GRM188R6YA475ME15D, Tolerance=20%, Voltage Rating=35V, Capacitance=4.7uF, Case/Package=0603, Height=0.8mm, Length=0.063inch, Mount="Surface Mount", Packaging="Tape and Reel", Supplier 1="Arrow Electronics", Termination=SMD/SMT, Thickness=0.039inch, Voltage Rating (DC)=35V, Weight=0.000222oz, Width=0.8mm
C4 C9 C17 C28: library part CAPACITOR_1uF_0603_25V, "Cap 1uF 25V +/-10% / Ceramic 0603", Supplier Part Number 1=1276-1102-1-ND, Tolerance="+/- 10%", Voltage=16V, Made By="Flip B", Supplier 1=Digikey
C4R C5C C11R: library part CAPACITOR_1uF_0402, "Cap 1uF 16V +/-10% / Ceramic 0402", Supplier Part Number 1=478-0402YD105KAT4ADKR-ND, Tolerance="+/- 10%", Voltage=16V, Made By="Robert Pafford", Supplier 1=Digi-Key
C5 C6 C8 C10 C18 C19 C27 C29: library part CAPACITOR_0.1uF_0603_25V, "Cap 100nF 25V +/-10% / Ceramic 0603", Supplier Part Number 1=1276-1006-1-ND, Tolerance="+/- 10%", Voltage=6.3V, ComponentLink1Description=Datsheet, ComponentLink1URL=https://www.mouser.com/datasheet/2/212/KEM_C1002_X7R_SMD-1102033.pdf, Made By="Flip B", Supplier 1=Digikey
C7 C11 C20 C30: library part CMP-2000-06038-3, "Multilayer Ceramic Capacitors 22μF ±20% 35V X5R SMD 0805", Case Code (Imperial)=0805, Case Code (Metric)=2012, Dielectric=X5R, Dielectric Material=Ceramic, Max Operating Temperature=85°C, Min Operating Temperature=-55°C, Package Quantity=2000, Tolerance=20%, Voltage Rating=35V, Capacitance=22uF, Case/Package=0805, Height=1.25mm, Lead Free="Lead Free", Length=0.079inch, Mount="Surface Mount", Packaging="Tape and Reel", REACH SVHC="No SVHC", RoHS Compliant=Yes, Series=C, Termination=SMD/SMT, Thickness=0.057inch, Voltage Rating (DC)=35V, Weight=0.000194oz, Width=0.049inch
C13 C14: library part CAPACITOR_10uF_1206_Tantalum_1, "Cap 10uF 16V +/-20% / Tantalum 1206", Supplier Part Number 1=26AC4143, Tolerance="+/- 10%", Value (uF)="10 uF", Voltage=16V, ComponentLink1Description=Digikey, ComponentLink1URL=https://www.digikey.com/en/products/detail/kyocera-avx/F981A106MMA/4004990, Made By="Dylan T", Supplier 1=Newark
C21 C24: library part CAPACITOR_1uF_0603, "Cap 1uF 16V +/-10% / Ceramic 0603", Supplier Part Number 1=399-7847-1-ND, Tolerance="+/- 10%", Voltage=16V, Made By="Flip B", Supplier 1=Digi-Key
C22 C25: library part CAPACITOR_0.1uF_0805, "Cap 100nF 50V +/-10% / Ceramic 0805", Supplier Part Number 1=38AH3645, Tolerance="+/- 10%", Voltage=50V, Made By="Robert Pafford", Supplier 1=Newark
C23 C26: library part CAPACITOR_0.022uF_0402, "Cap 22nF 25V +/-10% / Ceramic 0402", Supplier Part Number 1=445-1261-1-ND, Tolerance="+/- 10%", Voltage=25V, Made By="Robert Pafford", Supplier 1=Digi-Key
D1 D2 D3 D4: library part SCHOTTKY_40V_1.5A, "DIODE SCHOTTKY 40V 1.5A CST2C", Mfr_Name="Toshiba Electronic Devices & Storage Corp.", Supplier Part Number 1=CCS15S40L3FCT-ND, Copyright="Copyright (C) 2023 Ultra Librarian. All rights reserved.", Manufacturer_Part_Number=CCS15S40,L3F, RefDes=RefDes, Supplier 1=Digi-Key, Type=DEV
D1C: library part LED_RGB_4SMD, "LED RGB CLEAR 4SMD", Blue Forward Current=5mA, Blue Forward Voltage=2.8V, Color=RGB, Package=4-SMD, Red Forward Voltage=1.8V, Supplier Part Number 1=1080-1552-1-ND, ComponentLink1Description=Datasheet, ComponentLink1URL=https://everlightamericas.com/index.php?controller=attachment&id_attachment=3220, Green Forward Current=5mA, Green Forward Voltage=2.8V, Made By="Robert Pafford", Red Forward Current=5mA, Supplier 1=Digi-Key
D5: library part RCLAMP0504S.TCT, "25V Clamp 6A (8/20µs) Ipp Tvs Diode Surface Mount SOT-23-6", Breakdown Voltage (Min)=6V, Clamping Voltage (Max)=25V, Reverse Standoff Voltage (Typ)=5V, Supplier Part Number 1=RCLAMP0504SCT-ND, Made By="Robert Pafford", Supplier 1=Digi-Key
J1: library part SAMTEC-LS2-105-01-X-D-RA1, "10 Position Connector Self Mating, Non-Gendered, Hermaphroditic Through Hole, Right Angle Gold", Package=None, Supplier Part Number 1=200-LS210501FDRA1, Availability=Unavailable, MP=SAMTEC-LS2-105-01-X-D-RA1, Price=None, Supplier 1=Mouser
J1R: library part TC2030_SWD, "TagConnect TC2030 ARM SWD 6-pin"
J2: library part "CONN_MOLEX_MINIFIT JR_6POS_R/A", "Molex Minifit Jr. 5569  / 6 Pos R/A Natural", Color=Natural, Current Per Pin=13A, Manufacturer=Molex, Supplier Part Number 1=WM1353-ND, ComponentLink1Description=Datasheet, ComponentLink1URL=https://www.molex.com/pdm_docs/ps/PS-5556-001.pdf, Configuration="Right Angle", Created By="Flip B", Number of Positions=8, Pitch=4.2mm, Series="Minifit Jr 5569", Supplier 1=Digi-Key
J3: library part CONN_MICROUSB, "Amphenol Micro USB-B / USB2.0 5 Pin Right Angle SMD", Color=Silver, Current Per Pin=1.8A, Manufacturer=Amphenol, Supplier Part Number 1=609-4613-1-ND, ComponentLink1Description=Datasheet, ComponentLink1URL=https://cdn.amphenol-icc.com/media/wysiwyg/files/documentation/datasheet/inputoutput/io_usb_micro.pdf?__cf_chl_jschl_tk__=05693735e19256298f6ef6ca2bb2e65c376a4f56-1625503833-0-Abitsb0-ufjOXJYs_S3J3r2iTn-nObalbmXUksF1VvO_h_WEmRdMlUD1I8-hmWSEVWzY1pirKnrPZWfgY3851qyBZe5ZvnNQePLGIzUgdEIQBVUyW36RsbYpDLEWxJ4horD-5gChFgobLYqwmG5aHl0E8lIn_twwPPrOxilK2gP0q9t_CNOs_u5fMqXvXUrlsOv8tIE2NRlu6NVP8qtkL2GjhlkeTUbDMF8WvvpPDTFOgvZ4Y16Ej8F8AhWos88mo5B1HssXozw0XrkJQIqERITUu6rqloz9kf4ZzhBHtDAt-IkiAFY_Ds9SW8FYKKTtINJVpHZQ6Gyu1FFM4Dc9MO0maE8_mmNcwlxqyRoRk_MPWW8VyByXWM5RSp52jteRKw7FeI9WIYvCbPAOy0Eyib-aseIQsnGbglBcUY6_2xp8GYaJM38H3dNvBPsSOfJBPndKedwKHllxjkucXn6xsN0sDXkpGN-cu8_2bDTJ0g-uUucKSCooYX-ApSDNGpkA_p9zv1SOAD8c0zaZVmtiBsN75QpVz2rzq9_BFxOywPvR, Configuration="Right Angle", Created By="Flip B", Number of Positions=5, Pitch=0.65mm, Series=10118192, Supplier 1=Digi-Key
L1 L2 L3 L4: library part INDUCTOR_SRR1280-221K, "220 µH Shielded Drum Core, Wirewound Inductor 1.6 A 400mOhm Max Nonstandard", Mfr_Name="Bourns Electronics", Supplier Part Number 1=SRR1280-221KLCT-ND, Copyright="Copyright (C) 2023 Ultra Librarian. All rights reserved.", Manufacturer_Part_Number=SRR1280-221K, RefDes=RefDes, Supplier 1=Digi-Key, Type=DEV
R1 R1C R4 R4C R4R R5R R6C: library part RESISTOR_10K_0402, "RES 10k OHM 1% 1/16W 0402", Digikey Part Numer=CR0603-JW-104ELFTR-ND, Supplier Part Number 1=YAG3436CT-ND, Tolerance="+/- 1%", Value  (Ohms)=10K, Made By="Robert Pafford", Supplier=Digikey, Supplier 1=Digi-Key, Wattage=1/16W
R1R R6R R7R: library part RESISTOR_1K_0402, "RES 1k OHM 1% 1/16W 0402", Digikey Part Numer=CR0603-JW-104ELFTR-ND, Supplier Part Number 1=13-AC0402FR-131KLCT-ND, Tolerance="+/- 1%", Value  (Ohms)=1K, Made By="Robert Pafford", Supplier=Digikey, Supplier 1=Digi-Key, Wattage=1/16W
R2 R3 R5 R6: library part RESISTOR_27_0603, "RES 27 OHM 5% 1/8W 0603", Digikey Part Numer=CR0603-JW-104ELFTR-ND, Supplier Part Number 1=2019-RK73B1JTTD270JCT-ND, Tolerance="+/- 5%", Value  (Ohms)=27, ComponentLink1Description=Datasheet, ComponentLink1URL=https://www.bourns.com/docs/product-datasheets/CRxxxxx.pdf, Made By="Robert Pafford", Supplier=Digikey, Supplier 1=Digi-Key, Wattage=1/8W
R2C R3C: library part RESISTOR_60.4_0402, "RES 60.4 OHM 1% 1/16W 0402", Digikey Part Numer=CR0603-JW-104ELFTR-ND, Supplier Part Number 1=13-AC0402FR-0760R4LCT-ND, Tolerance="+/- 1%", Value  (Ohms)=60.4, Made By="Robert Pafford", Supplier=Digikey, Supplier 1=Digi-Key, Wattage=1/16W
R2R R3R: library part RESISTOR_27_0402, "RES 27 OHM 1% 1/16W 0402", Digikey Part Numer=CR0603-JW-104ELFTR-ND, Supplier Part Number 1=YAG5278DKR-ND, Tolerance="+/- 1%", Value  (Ohms)=27, Made By="Robert Pafford", Supplier=Digikey, Supplier 1=Digi-Key, Wattage=1/16W
R5C: library part RESISTOR_604_0402, "RES 604 OHM 1% 1/16W 0402", Digikey Part Numer=CR0603-JW-104ELFTR-ND, Supplier Part Number 1=13-AC0402FR-07604RLCT-ND, Tolerance="+/- 1%", Value  (Ohms)=604, Made By="Robert Pafford", Supplier=Digikey, Supplier 1=Digi-Key, Wattage=1/16W
R7: library part RESISTOR_10K_0.5%_0603, "RES 10k OHM 0.5% 1/10W 0603", Digikey Part Numer=CR0603-JW-104ELFTR-ND, Supplier Part Number 1=749-1695-1-ND, Tolerance="+/- 0.5%", Value  (Ohms)=10K, Made By="Robert Pafford", Supplier=Digikey, Supplier 1=Digi-Key, Wattage=1/10W
R7C R8C: library part RESISTOR_200_0402, "RES 200 OHM 1% 1/16W 0402", Digikey Part Numer=CR0603-JW-104ELFTR-ND, Supplier Part Number 1=YAG3453CT-ND, Tolerance="+/- 1%", Value  (Ohms)=200, Made By="Robert Pafford", Supplier=Digikey, Supplier 1=Digi-Key, Wattage=1/16W
SW1C: library part CAS-220TA_CAN_TERM, "GOLD SWITCH FLUSH SLIDE DPDT 100MA 6V", Current Rating="100 mA", Supplier Part Number 1=CAS220JCT-ND, Voltage Rating=6VDC, Contact Finish=Gold, Made By="Robert Pafford", Supplier 1=Digi-Key, Switch Function=DPDT
SW1R SW2R: library part "Tactile Switch SMD", "WS-TASV J-Bend SMT Tact Switch, SPST-NO, 16VDC, 50mA, 260g", Manufacturer="Wurth Elektronik", Operating Temperature Max=85°C, Operating Temperature Min=-40°C, Rated Current=50mA, Rated Voltage=16VDC, Category="Tact Switches", Circuit=SPST-NO, ComponentLink1Description="Website Link", ComponentLink1URL=https://www.we-online.com/redexpert/article/434123025826?ad, ComponentLink2Description="Datasheet Link", ComponentLink2URL=https://www.we-online.com/redexpert/spec/434123025826?ad, Contact Material="Stainless Steel", Contact Plating=Silver, Height=2.5mm, Length=4.2mm, Manufacturer Part Number=434123025826, Match Code=WS-TASV, Mount="Surface Mount", Operation Force=260g, Packaging="Tape and Reel", Terminal Material="Copper Alloy", Terminal Plating=Silver, Washable=No, Width=3.2mm
TP3 TP6 TPBlue TPGreen TPmiso TPmosi TPRed TPsck TPWhite: library part TESTPOINT, Made By="Robert Pafford"
U1 U2: "IC LED DRVR RGLTR PWM 1.5A 40QFN", Mfr_Name=STMicroelectronics, Supplier Part Number 1=497-18126-1-ND, Copyright="Copyright (C) 2023 Ultra Librarian. All rights reserved.", Manufacturer_Part_Number=L99LD20Q6TR, RefDes=RefDes, Supplier 1=Digi-Key, Type=DEV
U1C: "CANbus Controller CAN 2.0 SPI Interface 14-SOIC", Made By="Robert Pafford", Max FD Rate="8 Mbps"
U1R: "Raspberry Pi RP2040", Crystal Frequency="12 MHz", Input Voltage=3.3V, Available Busses="SPI, I2C, PWM, USB", ComponentLink1Description=DigiKey, ComponentLink2Description=Datasheet, ComponentLink2URL=https://datasheets.raspberrypi.org/rp2040/rp2040-datasheet.pdf, Made By="Robert Pafford", Number of GPIOs=29
U2C: library part TJA1442AT, "CAN Interface IC High-Speed CAN Transceiver with Standby Mode", Supplier Part Number 1=771-TJA1442AT/0Z, Made By="Robert Pafford", Max Data Rate=5Mbps, Supplier 1=Mouser
U2R: "IC FLASH 128MBIT SPI/QUAD 8SOIC", Supplier Part Number 1=W25Q128JVSIQ-ND, Made By="Robert Pafford", Size=128M, Supplier 1=Digi-Key
U3: "IC REG LIN 3.3V 800MA SOT223-4", Manufacturer="Texas Instruments", Package=SOT-223-4, PartNumber=LM1117IMP-3.3/NOPB, Supplier Part Number 1=LM1117IMPX-3.3/NOPBCT-ND, Amp Out=800mA, Created By="Dylan T", Supplier 1=Digi-Key, Vin (Max)=15V, Vout (Min/Fixed)=3.3V
Y1R: library part CRYSTAL_12MHz_SMD_SMALL, "12 MHz ±20ppm Crystal 18pF 100 Ohms 4-SMD, No Lead (3.2x2.5mm)", Frequency="12 MHz", Load Capacitance=18pF, Supplier Part Number 1=2151-RH100-12.000-18-2030-EXT-TRCT-ND, ESR="100 Ohms", Made By="Robert Pafford", Supplier 1=Digi-Key

## Free pads (board coordinates)
  round 0 hole 165 unplated: 1(250,250) 1(250,4750) 1(2648.66,4750) 1(2649.88,250)

## Via types
v1: diameter 22, hole 10, Top Layer to Bottom Layer, tented both sides, 103 vias
v2: diameter 27.56, hole 11.81, Top Layer to Bottom Layer, tented both sides, 33 vias
v3: diameter 28, hole 16, Top Layer to Bottom Layer, tented both sides, 20 vias
v4: diameter 31.5, hole 15.75, Top Layer to Bottom Layer, tented both sides, 17 vias
v5: diameter 40, hole 28, Top Layer to Bottom Layer, tented both sides, 14 vias
v6: diameter 45.28, hole 27.56, Top Layer to Bottom Layer, tented both sides, 4 vias
v7: diameter 40, hole 20, Top Layer to Bottom Layer, tented both sides, 3 vias

## Nets (pads, with @x,y where several pads share a name; then routed paths per layer and width w, separated by ;. In a path a pad name is that pad's centre, name@x,y a point inside that pad or via, vN(x,y) a via of type N, cw(c..) or ccw(c..) an arc to the next point about the centre after c; other vN are vias at no path point)
1v1_RP2040: C11R.1 C12R.1 C13R.1 U1R.23 U1R.45 U1R.50 | length 605.1
  Top Layer w7.87: U1R.45@656.26,2108.13 656.26,2156.85 v2(735,2156.85) U1R.50@735,2108.13 ; v2(664.13,2341.16) 667.9,2344.93 685.38,2344.93 700.63,2360.18 700.63,2362.64 703.5,2365.51 U1R.23@703.5,2378.8
  Bottom Layer w15.75: C11R.1@635,2112.92 636.94,2114.86 636.94,2138.66 652.07,2153.79 v2(655,2153.79) ; C12R.1@687.76,2383.82 687.76,2361.59 667.33,2341.16 v2(664.13,2341.16) 725,2280.29 725,2245.42 735,2235.42 v2(735,2156.85) C13R.1@780.87,2156.85
3V3: C1C.1 C2.1 C3C.1 C3R.1 C4R.1 C5C.1 C5R.1 C6R.1 C7R.1 C8R.1 C9R.1 C10R.1 C14.1 C15.1 D1C.4 J1R.2 R1.1 R1C.1 R4.1 R4C.1 R4R.1 R5R.1 R7.1 U1.7 U1C.14 U1R.1 U1R.10 U1R.22 U1R.33 U1R.42 U1R.43 U1R.44 U1R.48 U1R.49 U2.7 U2C.5 U2R.8 U3.2 U3.4 | length 4569.6
  Top Layer w7.87: C10R.1@522.4,2134.6 573.89,2134.6 578.5,2139.22 578.5,2141.1 U1R.42@591.79,2141.1 605.08,2141.1 U1R.43@624.76,2121.42 ; U1R.33@591.79,2282.83 611.6,2282.83 628.87,2300.1 628.87,2310.56 v2(632.64,2314.33) ; C4R.1@618.27,2054.49 C4R.1@618.27,2055.27 ; U1R.48@703.5,2108.13 703.5,2080.02 712.73,2070.8 v2@720,2070.8 ; U1R.49@719.25,2108.13 719.25,2071.55 v2@720,2070.8 ; U1R.22@719.25,2378.8 719.25,2353.7 729.05,2343.9 743.65,2343.9 v2@744.97,2342.59 ; v2(725,2070.8) v2@720,2070.8 ; v2(747.42,2340.14) v2@744.97,2342.59 ; U1R.1@862.46,2141.1 887.49,2141.1 900.35,2128.24 v2(900.35,2125.35) ; U1R.10@862.46,2282.83 842.65,2282.83 833.43,2292.06 833.43,2308.3 833.43,2334.01 822.94,2344.5 746.87,2344.5 v2@744.97,2342.59 ; C4R.1@618.27,2055.27 618.27,2088.35 624.76,2094.84 U1R.43@624.76,2108.13 U1R.44@640.51,2108.13 640.51,2076.73 626.14,2062.36 625.35,2062.36 C4R.1@618.27,2055.27
  Top Layer w9.8: 1615,2846.26 U1.7@1650.5,2846.26
  Top Layer w9.84: U2R.8@709.47,1822.01 v6(782.24,1822.01) ; D1C.4@996.81,2621.42 996.52,2621.71 996.52,2674.13 C5C.1@998.92,2676.53 ; 1460,1486.26 U2.7@1509,1486.26
  Top Layer w10: 229.69,2785.48 230,2785.8 ; C5C.1@996.8,2676.53 C5C.1@998.92,2676.53
  Top Layer w15.75: 654.42,1839.55 668.14,1839.55 685.68,1822.01 U2R.8@709.47,1822.01
  Top Layer w16: 1100,2385.8 1185,2385.8 1210,2410.8 1210,2665.8 1390.46,2846.26 1615,2846.26 ; 1101.94,2046.37 1335,2046.37 ; R4.1@1390,2031.04 1374.66,2046.37 1335,2046.37 ; 1460,1486.26 1379.54,1486.26 1335,1530.8 1335,2046.37 ; C2.1@1528,2840.8 C2.1@1540,2840.8
  Top Layer w20: 229.69,2785.48 C1C.1@229.69,2747.4 230.18,2746.91 230.18,2666.2 U1C.14@230.67,2665.71 230.67,2649.55 274.42,2605.8 v7(275,2605.8)
  Top Layer w60: 1065,3130.8 U3.4@1150,3130.8
  Bottom Layer w7.87: 715,2025.16 719.25,2020.9
  Bottom Layer w15.75: v4(483.03,2282.83) 515.91,2315.71 C9R.1@589.33,2315.71 590.02,2315.02 v2@624.76,2315.02 ; v4(601.14,2424.57) 625.16,2400.55 625.16,2365.09 624.76,2364.7 624.76,2322.2 v2(632.64,2314.33) ; C8R.1@746.92,2383.82 746.92,2340.64 v2(747.42,2340.14) ; v2(900.35,2125.35) C7R.1@938.35,2125.35
  Bottom Layer w16: v2@935,2280.8 C6R.1@967.87,2280.8 C6R.1@977.87,2280.8
  Bottom Layer w20: v7(145,2605.8) v7(275,2605.8)
  Bottom Layer w23.62: 715,2025.16 715,2031.17 724.25,2040.42 724.25,2070.05 v2(725,2070.8)
  Bottom Layer w45.28: v6(404.29,3062.36) 428.11,3086.18 428.11,3135.82 455.04,3162.76 751.05,3162.76 786.86,3126.95 v6(810.67,3126.95) ; v6(528.51,2015.12) 679.21,2015.12 685,2020.9 719.25,2020.9 742.51,2020.9 782.24,1981.17 v6(782.24,1822.01)
  other v2: 925,2280.8
+5V: C4C.1 C13.1 C21.1 C22.1 C23.1 D5.5 J2.5 U2C.3 U3.3 | length 4467.9
  Top Layer w15.75: C4C.1@303.31,2834.01 303.31,2834.8 v2@321.78,2853.28 ; U2C.3@319.06,2923.58 322.07,2920.57 322.07,2868.99 v2(325.55,2865.51)
  Top Layer w20: v7(100,2845.8) 100,2280 v5(290,2090) ; v5(330,1790.8) 330.36,1791.15 360.36,1791.15 380,1810.8 D5.5@380,1902.65
  Top Layer w40: 990.35,3881.15 C21.1@990.35,4065.8 ; 1110.35,3381.15 1155.71,3335.8 C13.1@1421.48,3335.8 1425,3335.8 U3.3@1425,3221.35 ; 1110.35,3565.8 1110.35,3691.86
  Bottom Layer w15.75: v7(100,2845.8) 103.91,2841.89 298.73,2841.89 322.36,2865.51 v2(325.55,2865.51)
  Bottom Layer w20: v5(290,2090) 290,2000.8 270,1980.8 270,1850.8 v5(330,1790.8)
  Bottom Layer w40: v7(100,2845.8) 100,3681.77 706.22,4287.99 957.72,4287.99 J2.5@1044.65,4201.06
"Blue Anode": C20.1 J1.4 L3.2 R6.1 TPBlue.TP | length 1609.5
  Top Layer w40: 2065,1330.8 2480,1330.8 2640,1490.8 2640,2000.8 2640,2370.8 2598.47,2412.33 2594.38,2412.33 J1.4@2576.43,2430.28
CANCLK_RP2CAN: U1C.6 U1R.32 | length 224.7
  Top Layer w7.87: U1C.6@480.67,2451.14 480.67,2365.13 547.22,2298.58 U1R.32@591.79,2298.58
CANH: J2.4 SW1C.4 U2C.7 | length 2052.8
  Top Layer w7.87: U2C.7@269.06,3121.42 U2C.7@269.06,3138.15 269.06,3174.85 445.63,3351.43 445.63,3363.54 SW1C.4@461.38,3379.29
  Top Layer w8: SW1C.4@476.06,3393.97 476.06,4146.06 825,4495 930,4495 965,4460 965,4286.77 J2.4@879.29,4201.06
  Top Layer w10: SW1C.4@461.38,3379.29 SW1C.4@476.06,3393.97
CANL: J2.1 SW1C.1 U2C.6 | length 1548.8
  Top Layer w8: U2C.6@319.06,3138.15 319.06,3154.88 397.8,3233.62 SW1C.1@461.38,3233.62 461.38,3245.43 495.06,3279.12 495.06,4033.37 J2.1@879.29,4417.6
CANRX_RP2CAN: U1C.2 U2C.4 | length 845.6
  Top Layer w7.87: U1C.2@280.67,2451.14 280.67,2434.41 257.05,2410.79 220.88,2410.79 191.1,2440.57 191.1,2945.77 209.27,2963.94 345.43,2963.94 369.06,2940.31 U2C.4@369.06,2923.58
CANTX_RP2CAN: U1C.1 U2C.1 | length 487.4
  Top Layer w7.87: U2C.1@219.06,2923.58 219.06,2821.24 206.85,2809.03 206.85,2639.39 230.67,2615.57 U1C.1@230.67,2451.14
"Conn CHK": J1.9 U1R.37 | length 4853.3
  Top Layer w8: v3(450,2220.8) 450.89,2219.9 591.73,2219.9 U1R.37@591.79,2219.84
  Top Layer w16: v3(455,1685) 1439.2,700.8 2095,700.8 v3@2419.6,1025.4
  Bottom Layer w16: v3(450,2220.8) 450,1698.49 452.7,1695.78 452.7,1687.3 v3(455,1685) ; v3(2420,1025) 2420,2576.62 J1.9@2501.26,2657.88
CSN1: R1.2 U1.3 U1R.12 | length 1385.6
  Top Layer w8: U1R.12@862.46,2314.33 1061.47,2314.33 1105,2270.8 v1(1125,2270.8) ; v1(1130,2485.8) 1130,2780.8 1290,2940.8 1525,2940.8 1545,2940.8 1580,2940.8 1594.82,2925.98 ; 1594.82,2925.02 U1.3@1650.5,2925.02
  Bottom Layer w8: v1(1125,2270.8) 1127.5,2273.3 1127.5,2483.3 v1(1130,2485.8)
CSN2: R4.2 U1R.8 U2.3 | length 1214.1
  Top Layer w8: U1R.8@862.46,2251.34 884.46,2251.34 915,2220.8 915,2220.49 919.69,2215.8 1100,2215.8 1140,2175.8 1140,2123.52 1187.72,2075.8 1400,2075.8 1427.92,2047.88 1427.92,2026.58 R4.2@1428.7,2025.8 1428.7,1616.11 1479.79,1565.02 U2.3@1509,1565.02